# EAGLE board Pcb39 (EAGLE 8.3.2)
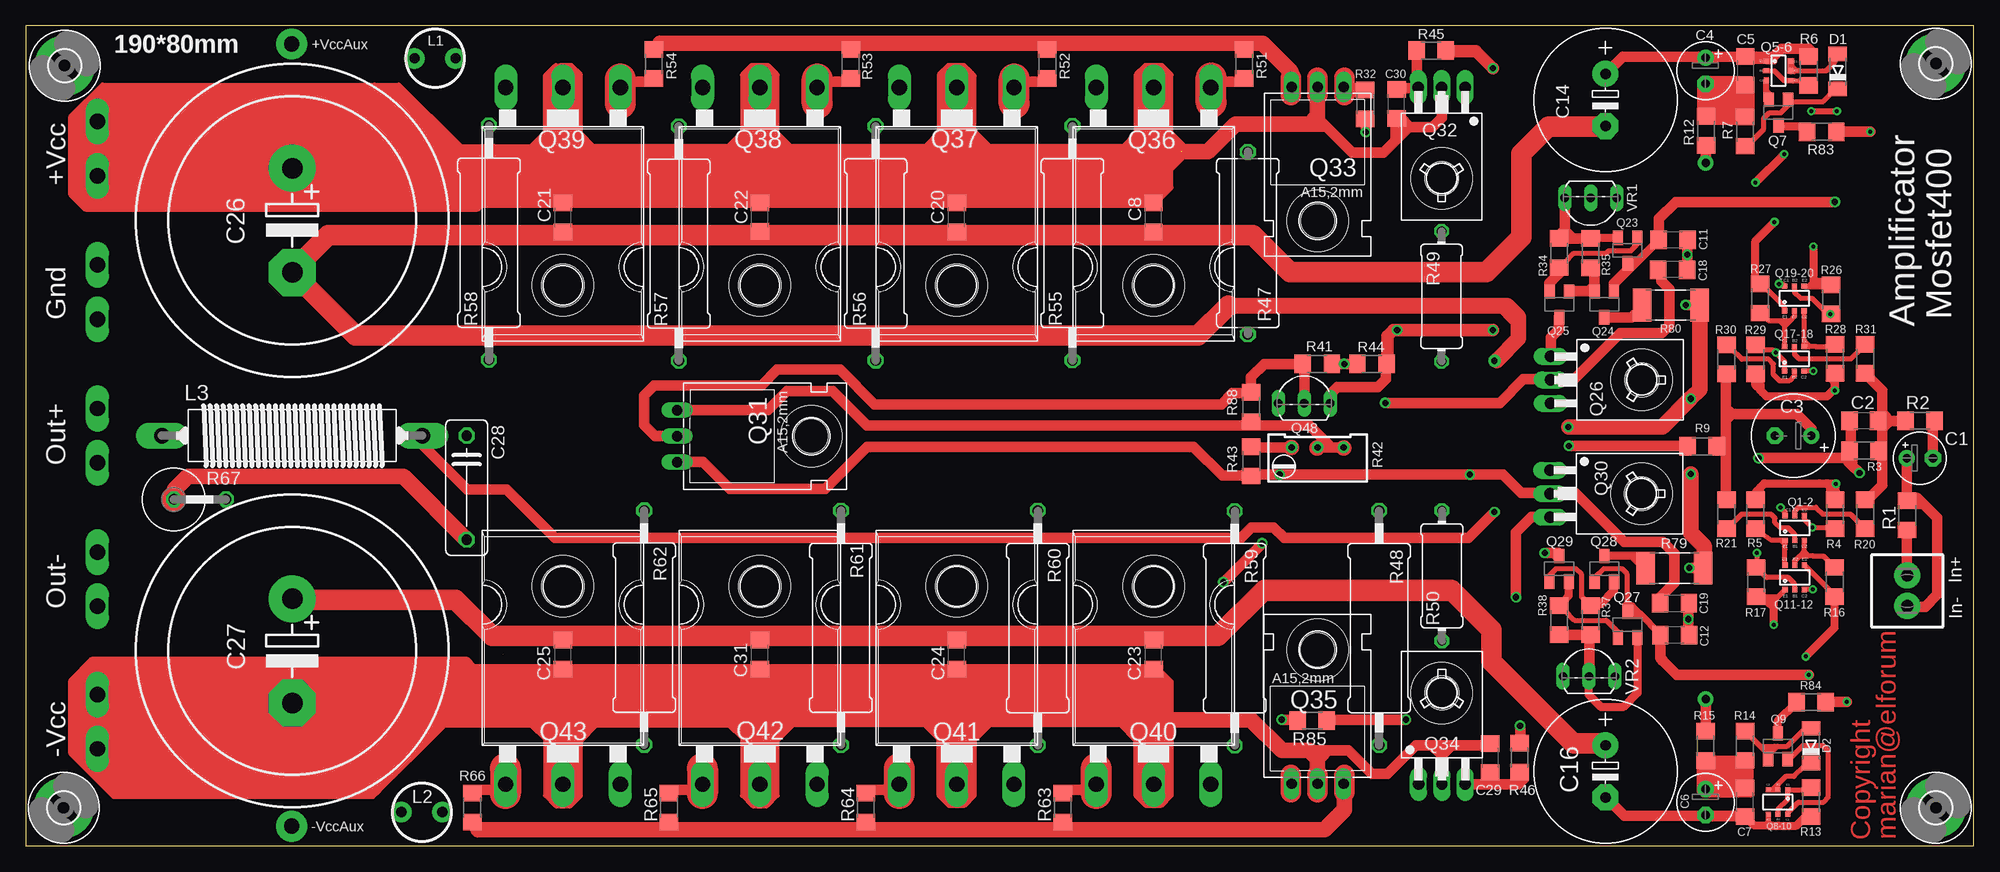
[diagram p0: board, top side]
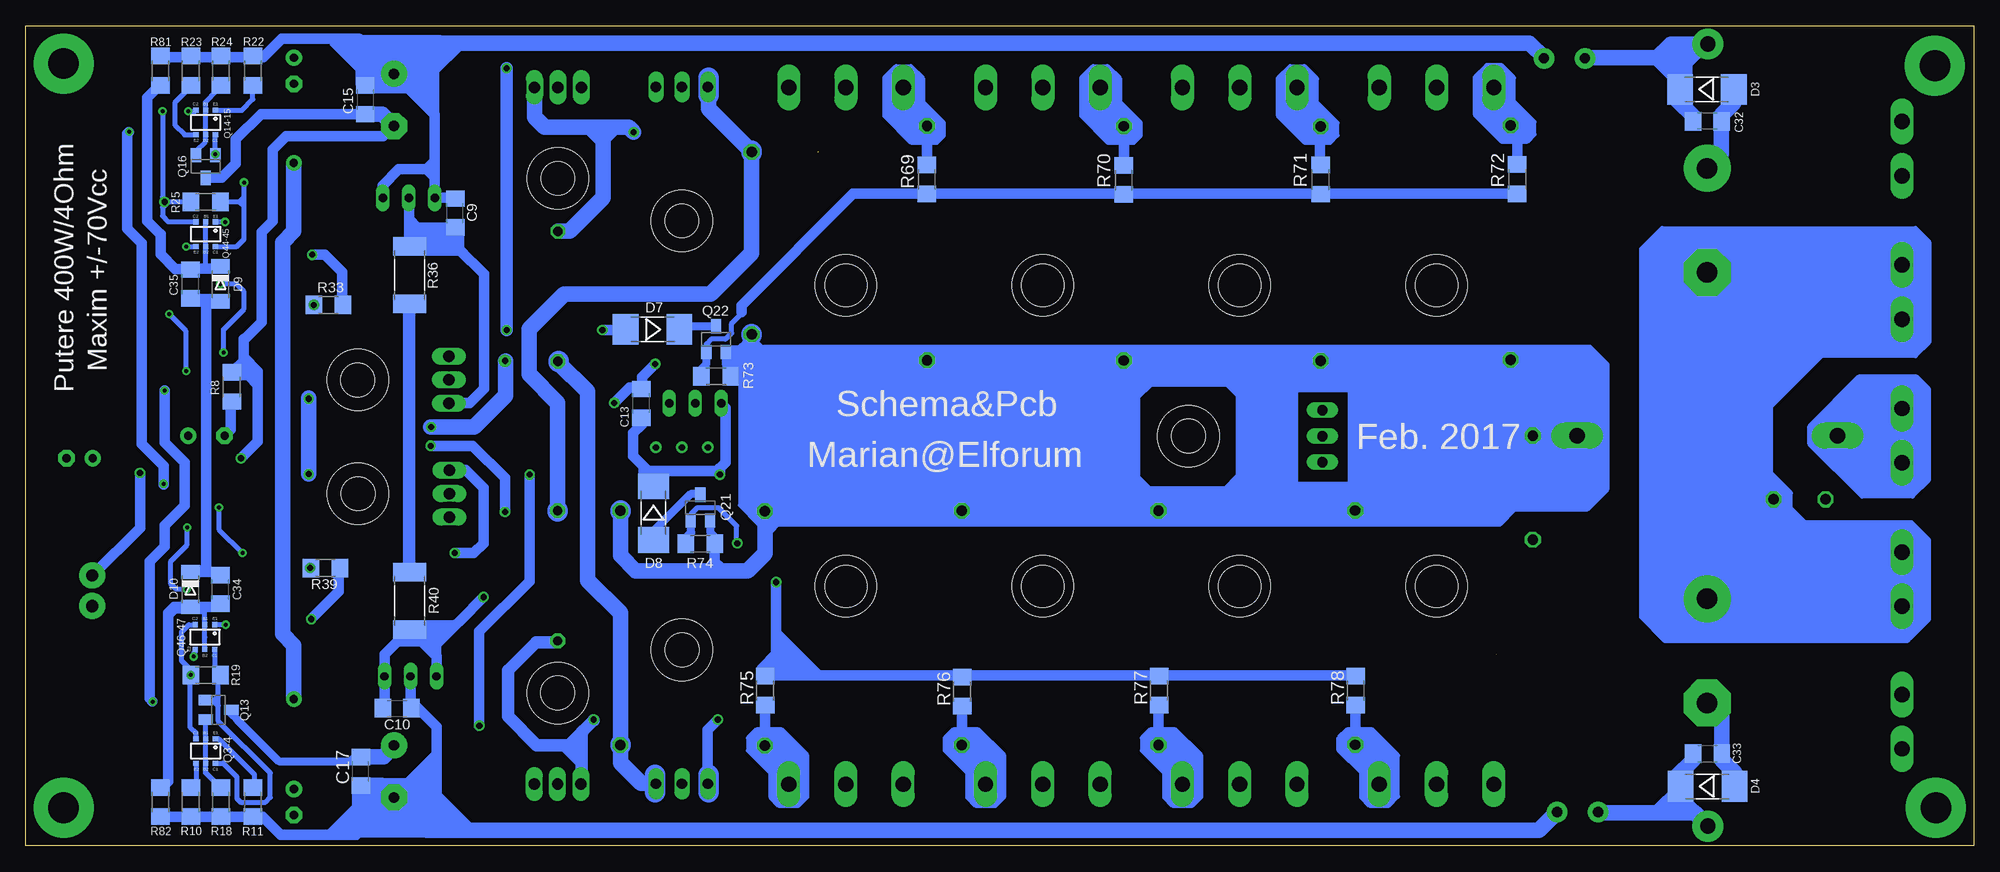
[diagram p1: board, bottom side, seen from below]

Size 190 x 80 mm. Coordinates in mm from the lower left corner, seen from the top.
Outline: 46.57,18.64 46.56,18.65
Outline: 0,0 190,0 190,80 0,80 0,0
Copper layers (1*16): Top 0.035mm / dielectric 1.5mm / Bottom 0.035mm
Design rules "default": minimum track width 10mil, minimum drill 24mil, track to track 8mil, track to pad 8mil, pad to pad 8mil, via to via 8mil, smd to smd 8mil, copper to edge 40mil, drill to drill 8mil, minimum pad ring 10mil, minimum via ring 8mil, stop-mask expansion 4mil, vias tented up to drill 0mil, thermal gap 10mil
Holes 6 mm at 157.6,45.45 157.6,34.35 138.1,14.9 126,19.1 138.1,65.1 126,60.95 110,25.3 90.8,25.3 71.6,25.3 52.4,25.3 52.4,54.65 71.6,54.65 90.8,54.65 110,54.65 76.6,39.95

## Footprints (pad centres in the part's own frame; a part is rotated, then mirrored left to right if it is on the bottom)
E2,5-5 = drill 0.813 pad 1.6: + -1.27,0 | drill 0.813 pad 1.6 octagon: - 1.27,0
C1206 = smd 1.6 x 1.8: 1 -1.4,0; 2 1.4,0
E3,5-8 = drill 0.813 pad 1.6: + -1.778,0 | drill 0.813 pad 1.6 octagon: - 1.778,0
E2,5-6 = drill 0.813 pad 1.6: + -1.27,0 | drill 0.813 pad 1.6 octagon: - 1.27,0
E5-13 = drill 1.016 pad 2.54: + -2.54,0 | drill 1.016 pad 2.54 octagon: - 2.54,0
EB30D = drill 2.007 pad 4.597: + -5.08,0 | drill 2.007 pad 4.597 octagon: - 5.08,0
C102-043X133 = drill 1.016 octagon: 1 -5.08,0; 2 5.08,0
MINIMELF = smd 1.4 x 1.8: A 1.7,0; C -1.7,0
MELF-MLL41 = smd 2.5 x 3: A 2.625,0; C -2.625,0
62409-1 = drill 1.5 pad 1.9 long: A1 -2.65,0; A2 2.65,0
CONR2P = drill 1.2 pad 2.54: 1 -1.48,0; 4 1.52,0
3,0-PAD = drill 3 pad 5.842: B3,0 0,0
VERT6MM = drill 1 pad 2: 1 -2,0; 2 2,0
DR1,5A = drill 1.5 pad 2.54 long: 1 -12.7,0; 2 12.7,0
SC74_INFINEON = smd 0.5 x 0.5: 1 -0.95,-1.2; 2 0,-1.2; 3 0.95,-1.2; 4 0.95,1.2; 5 0,1.2; 6 -0.95,1.2
SOT23 = smd 1 x 1.4: 1 -0.95,-1.25; 2 0.95,-1.25; 3 0,1.25
SOT23' = smd 1 x 1.4: 1 -0.95,-1.1; 2 0.95,-1.1; 3 0,1.1
BD679H = drill 1.118 long: B 2.286,-3.81; C 0,-3.81; E -2.286,-3.81 | hole 3.302: 0,5.08
TO220AHV = drill 1.016 long: B -2.54,-1.905; C 0,-1.905; E 2.54,-1.905 | hole 3.302: 0,11.176
TO247BH = drill 1.499 long: D 0,-10.16; G -5.588,-10.16; S 5.588,-10.16 | hole 4.115: 0,9.144
TO92-EBC = drill 0.813 long: B 0,-1.27; C -2.54,-1.27; E 2.54,-1.27
R1206 = smd 1.6 x 1.803: 1 -1.422,0; 2 1.422,0
R2512 = smd 1.8 x 3.2: 1 -2.8,0; 2 2.8,0
RTRIM64W = drill 0.61: 1 1.27,-2.54; 2 1.27,0; 3 1.27,2.54
0617/17 = drill 1.016 octagon: 1 -8.89,0; 2 8.89,0
0617/22 = drill 1.016 octagon: 1 -11.43,0; 2 11.43,0
0411/12 = drill 0.914 octagon: 1 -6.35,0; 2 6.35,0
0617V = drill 1.016 octagon: 1 -2.54,0; 2 2.54,0
TO92- = drill 0.813 long: 1 2.54,0; 2 0,0; 3 -2.54,0

## Placement (x,y rotation side)
C1  4.7u  [E2,5-5]  184.73,37.81 0 top
C2  220p  [C1206]  179.26,41.46 0 top
C3  100u  [E3,5-8]  172.37,39.99 180 top
C4  47u  [E2,5-6]  163.83,75.6 270 top
C5  100n  [C1206]  167.71,75.6 270 top
C6  47u  [E2,5-6]  163.83,4.25 270 top
C7  100n  [C1206]  167.69,4.25 90 top
C8  1u  [C1206]  109.99,61.3 90 top
C9  1u  [C1206]  148.11,61.72 90 bottom
C10  1u  [C1206]  153.76,13.41 0 bottom
C11  47p  [C1206]  160.66,59.11 0 top
C12  47p  [C1206]  160.82,20.54 180 top
C13  1u  [C1206]  129.96,43.15 90 bottom
C14  100u  [E5-13]  154.08,72.75 270 top
C15  100n  [C1206]  156.89,72.76 270 bottom
C16  100u  [E5-13]  154.08,7.25 270 top
C17  100n  [C1206]  157.31,7.26 90 bottom
C18  330p  [C1206]  160.62,56.19 180 top
C19  330p  [C1206]  160.8,23.66 0 top
C20  1u  [C1206]  90.8,61.3 90 top
C21  1u  [C1206]  52.4,61.29 90 top
C22  1u  [C1206]  71.6,61.31 90 top
C23  1u  [C1206]  110,18.64 90 top
C24  1u  [C1206]  90.8,18.64 90 top
C25  1u  [C1206]  52.4,18.64 90 top
C26  2.2m  [EB30D]  26,61 270 top
C27  2.2m  [EB30D]  26,19 270 top
C28  100n  [C102-043X133]  43.01,34.93 270 top
C29  100p  [C1206]  142.81,8.56 270 top
C30  100p  [C1206]  133.69,72.36 90 top
C31  1u  [C1206]  71.6,18.64 90 top
C32  1n  [C1206]  26,70.67 180 bottom
C33  1n  [C1206]  25.98,8.98 0 bottom
C34  1n  [C1206]  171,25 90 bottom
C35  1n  [C1206]  173.93,54.8 90 bottom
D1  4148  [MINIMELF]  176.72,75.52 90 top
D2  4148  [MINIMELF]  174.12,9.75 90 top
D3  UF4007  [MELF-MLL41]  26.03,73.78 0 bottom
D4  UF4007  [MELF-MLL41]  25.98,5.78 0 bottom
D7  UF4007  [MELF-MLL41]  128.87,50.37 180 bottom
D8  UF4007  [MELF-MLL41]  128.77,32.45 270 bottom
D9  DZ33V  [MINIMELF]  171,54.8 270 bottom
D10  DZ33V  [MINIMELF]  173.93,25 270 bottom
E$1  [62409-1]  7,12.1 90 bottom
E$2  [62409-1]  7,26 90 bottom
E$3  [62409-1]  7,68 90 top
E$4  [62409-1]  7,54 90 top
E$5  [62409-1]  7,40 90 top
E$6  [CONR2P]  183.5,24.85 90 top
E$7  [3,0-PAD]  3.8,76.1 0 top
E$8  [3,0-PAD]  3.7,3.7 0 top
E$9  [3,0-PAD]  186.3,3.7 0 top
E$10  [3,0-PAD]  186.3,76.3 0 top
L1  1mH  [VERT6MM]  39.93,76.82 0 top
L2  1mH  [VERT6MM]  38.64,3.27 0 top
L3  1u  [DR1,5A]  25.99,40 0 top
Q1-2  BC856U-1  [SC74_INFINEON]  172.53,30.99 0 top
Q3-4  BC846U-2  [SC74_INFINEON]  172.44,9.24 180 bottom
Q5-6  BC856U-1  [SC74_INFINEON]  170.94,75.59 270 top
Q7  MMBT5401  [SOT23]  170.94,71.52 180 top
Q8-10  BC846U-1  [SC74_INFINEON]  170.89,4.25 180 top
Q9  MMBT5551  [SOT23]  170.89,9.71 0 top
Q11-12  BC846U  [SC74_INFINEON]  172.53,26.17 0 top
Q13  MMBT5551  [SOT23]  171.19,13.26 270 bottom
Q14-15  BC856U-2  [SC74_INFINEON]  172.44,70.56 180 bottom
Q16  MMBT5401  [SOT23']  172.44,66.26 180 bottom
Q17-18  BC846U-1  [SC74_INFINEON]  172.49,47.49 0 top
Q19-20  BC856U  [SC74_INFINEON]  172.49,53.38 0 top
Q21  MMBT5401  [SOT23]  124.2,32.98 0 bottom
Q22  MMBT5551  [SOT23]  122.67,49.41 0 bottom
Q23  MMBT5401  [SOT23]  156.22,58.06 180 top
Q24  MMBT5401  [SOT23]  153.95,52.81 180 top
Q25  MMBT5401  [SOT23]  149.58,52.81 180 top
Q26  MJE350  [BD679H]  152.53,45.44 270 top
Q27  MMBT5551  [SOT23]  156.22,21.56 0 top
Q28  MMBT5551  [SOT23]  153.96,27.01 0 top
Q29  MMBT5551  [SOT23]  149.55,27.01 0 top
Q30  MJE340  [BD679H]  152.49,34.34 270 top
Q31  IRF540  [TO220AHV]  65.44,39.95 270 top
Q32  MJE340  [BD679H]  138.1,70.18 180 top
Q33  MJE15032  [TO220AHV]  126,72.13 180 top
Q34  MJE350  [BD679H]  138.12,9.83 0 top
Q35  MJE15033  [TO220AHV]  125.99,7.94 0 top
Q36  IRFP240  [TO247BH]  110,63.81 180 top
Q37  IRFP240  [TO247BH]  90.8,63.81 180 top
Q38  IRFP240  [TO247BH]  71.6,63.81 180 top
Q39  IRFP240  [TO247BH]  52.4,63.81 180 top
Q40  IRFP9240  [TO247BH]  110,16.15 0 top
Q41  IRFP9240  [TO247BH]  90.8,16.15 0 top
Q42  IRFP9240  [TO247BH]  71.6,16.15 0 top
Q43  IRFP9240  [TO247BH]  52.4,16.15 0 top
Q44-45  BC846U-1  [SC74_INFINEON]  172.44,59.66 180 bottom
Q46-47  BC856U-2  [SC74_INFINEON]  172.52,20.36 180 bottom
Q48  BC556C  [TO92-EBC]  124.7,44.43 0 top
R1  100k  [R1206]  183.5,32.22 90 top
R2  470  [R1206]  184.76,41.45 0 top
R3  18k  [R1206]  179.3,38.55 180 top
R4  100  [R1206]  176.46,32.34 90 top
R5  100  [R1206]  168.69,32.34 90 top
R6  330  [R1206]  173.9,75.58 270 top
R7  15k  [R1206]  167.7,69.66 90 top
R8  470  [R1206]  169.9,44.75 90 bottom
R9  18k  [R1206]  163.49,38.95 0 top
R10  150  [R1206]  173.9,4.25 270 bottom
R11  150  [R1206]  167.82,4.25 270 bottom
R12  15k  [R1206]  163.87,69.72 90 top
R13  330  [R1206]  174.12,4.25 270 top
R14  15k  [R1206]  167.67,9.75 90 top
R15  15k  [R1206]  163.82,9.74 90 top
R16  5k6  [R1206]  176.43,25.72 270 top
R17  5k6  [R1206]  168.77,25.72 90 top
R18  1k  [R1206]  170.94,4.25 270 bottom
R19  100k  [R1206]  172.44,16.63 0 bottom
R20  330  [R1206]  179.41,32.34 90 top
R21  330  [R1206]  165.86,32.34 90 top
R22  150  [R1206]  167.82,75.6 270 bottom
R23  33k  [R1206]  173.9,75.6 270 bottom
R24  1k  [R1206]  170.94,75.6 270 bottom
R25  100k  [R1206]  172.44,62.79 180 bottom
R26  5k6  [R1206]  176.09,53.29 90 top
R27  5k6  [R1206]  169.14,53.38 90 top
R28  100  [R1206]  176.46,47.49 270 top
R29  100  [R1206]  168.69,47.46 90 top
R30  330  [R1206]  165.86,47.45 90 top
R31  330  [R1206]  179.41,47.49 270 top
R32  4,7  [R1206]  130.66,72.32 270 top
R33  1k  [R1206]  160.47,52.74 180 bottom
R34  15  [R1206]  149.56,57.82 90 top
R35  1k  [R1206]  152.61,57.81 90 top
R36  33k/2512  [R2512]  152.56,55.66 90 bottom
R37  1k  [R1206]  152.61,22 90 top
R38  15  [R1206]  149.56,21.99 90 top
R39  1k  [R1206]  160.77,27.09 0 bottom
R40  33k/2512  [R2512]  152.54,23.89 270 bottom
R41  1k  [R1206]  125.97,46.99 0 top
R42  5k  [RTRIM64W]  126,37.58 90 top
R43  3k3  [R1206]  119.54,37.49 270 top
R44  22  [R1206]  131.3,46.99 0 top
R45  4,7  [R1206]  137.06,77.56 180 top
R46  4,7  [R1206]  145.71,8.59 270 top
R47  47/3W  [0617/17]  119.2,58.79 90 top
R48  47/3W  [0617/22]  132,21.23 270 top
R49  220/1W  [0411/12]  138.08,53.59 90 top
R50  220/1W  [0411/12]  138.12,26.33 270 top
R51  10  [R1206]  118.85,76.27 90 top
R52  10  [R1206]  99.65,76.27 90 top
R53  10  [R1206]  80.45,76.27 90 top
R54  10  [R1206]  61.25,76.27 90 top
R55  0.33/3W  [0617/22]  102.09,58.78 270 top
R56  0.33/3W  [0617/22]  82.89,58.76 270 top
R57  0.33/3W  [0617/22]  63.69,58.74 270 top
R58  0.33/3W  [0617/22]  45.19,58.82 270 top
R59  0.33/3W  [0617/22]  117.92,21.21 90 top
R60  0.33/3W  [0617/22]  98.72,21.23 90 top
R61  0.33/3W  [0617/22]  79.52,21.25 90 top
R62  0.33/3W  [0617/22]  60.32,21.27 90 top
R63  10  [R1206]  101.14,3.73 90 top
R64  10  [R1206]  81.95,3.73 90 top
R65  10  [R1206]  62.75,3.73 90 top
R66  10  [R1206]  43.55,3.73 90 top
R67  10/3W  [0617V]  16.99,33.78 0 top
R69  470  [R1206]  102.12,65 90 bottom
R70  470  [R1206]  82.92,64.94 90 bottom
R71  470  [R1206]  63.72,64.98 90 bottom
R72  470  [R1206]  44.52,65.02 90 bottom
R73  100  [R1206]  122.67,45.8 180 bottom
R74  100  [R1206]  124.19,29.45 0 bottom
R75  470  [R1206]  117.88,15.12 90 bottom
R76  470  [R1206]  98.68,15.03 90 bottom
R77  470  [R1206]  79.47,15.13 90 bottom
R78  470  [R1206]  60.28,15.12 90 bottom
R79  2k2/2512  [R2512]  160.78,27.07 0 top
R80  2k2/2512  [R2512]  160.45,52.73 180 top
R81  150  [R1206]  176.84,75.6 270 bottom
R82  33k  [R1206]  176.84,4.25 270 bottom
R83  15k  [R1206]  175.16,69.65 180 top
R84  15k  [R1206]  174.13,14 0 top
R85  4,7  [R1206]  125.48,12.2 180 top
R88  8k2  [R1206]  119.53,42.8 270 top
VR1  TL431  [TO92-]  152.63,63.18 180 top
VR2  TL431  [TO92-]  152.47,16.52 0 top

## Library data of the parts
C1-C35 R1-R46 R51-R54 R63-R66 R69-R85 R88 = resistor
D1-D4 D7-D10 = diode
E$1-E$5 = con-faston
E$6 = ConR2p3m-2
E$7-E$10 = holes
L1 L2 = inductor-neosid2
L3 = inductors2
Q1-2 Q3-4 Q5-6 Q8-10 Q11-12 Q14-15 Q17-18 Q19-20 Q44-45 Q46-47 = transistor-fet
Q7 Q9 Q13 Q21-Q25 Q27-Q29 = transistor-npn2
Q16 VR1 VR2 = transistor-npn
Q26 Q30 Q32 Q34 = transistor-power3
Q31 Q33 Q35-Q43 = transistor-power
Q48 = transistor-pnp
R47-R50 R55-R62 R67 = resistor; OC_FARNELL: unknown; OC_NEWARK: unknown

## Nets
S$38: Q9.1
S$53: Q9.3 R84.1
S$56: C7.1 Q8-10.4 R13.2
S$103: R48.2
S$104: Q8-10.2 Q8-10.3
S$129: R47.1
S$148: R42.2
S$160: Q8-10.1 R13.1
S$179: C17.2
S$201: C6.-
S$232: Q3-4.1 R11.1
S$233: Q3-4.4 R10.1
S$234: Q3-4.2 Q3-4.5 Q13.2 R18.1
S$235: Q3-4.3 Q46-47.3 R19.1
S$236: Q3-4.6 Q13.1
S$274: Q46-47.6 R19.2
S$276: Q11-12.1 R17.1
S$281: Q1-2.6 Q11-12.2 R17.2
S$282: Q11-12.4 R16.2
S$283: Q1-2.3 Q11-12.5 R16.1
S$284: D10.C
S$286: Q46-47.2 Q46-47.5
S$290: Q1-2.1 Q11-12.6 R5.1
S$291: Q1-2.4 R4.1
S$292: Q1-2.2
S$293: R9.2
S$294: Q1-2.5
S$297: R28.2 R84.2
S$307: R4.2 R83.1

## Tracks (layer width: path | path; a pad name or v marks a point on that pad's centre or on a via)
S$1
  Top 1: 154.05,75.25 155.75,76.95 170.45,76.95 171.25,77.75 173.9,77.75 174.25,77.4
S$2
  Top 1: 167.6,74.3 163.8,74.3 163.8,71.1
S$3
  Top 1: 163.85,71.05 167.65,71.05
S$4
  Top 0.6: 169.75,74.65 169.75,74.05 169.75,73.6 | 169.75,73.6 170.2,73.15 170.2,72.7 | 169.75,73.6 169.75,72.65 169.9,72.5
S$5
  Top 0.5: 173.35,74.65 171.5,74.65 170.55,75.6 169.65,75.6
S$6
  Top 0.6: 172.15,75.55 172.15,76.55
S$7
  Top 0.5: 172.05,75.6 175.6,75.6 175.85,75.85 176.1,76.1 | 176.1,76.1 176.45,76.45 176.45,76.8 | 176.1,76.1 176.1,76.95
S$8
  Top 0.5: 171.9,72.6 175.3,72.6 176.5,73.8
S$9
  Top 0.5: 171.9,72.55 171.9,72.25 171.15,71.5 170.05,71.5 169.5,70.95 169.5,70.55 169.5,70.4 169.5,69.9 168.4,68.8
S$10
  Top 0.8: 173.65,70.15 170.9,70.15
S$11
  Top 1: 154.05,4.75 155.9,2.9 163.8,2.9 163.85,2.9 167.55,2.9
S$12
  Top 1: 163.8,5.6 167.7,5.6
S$13
  Top 1: 163.65,8.3 167.75,8.3
S$14
  Top 1: 163.8,5.55 163.8,8.1
S$15
  Top 1: 63.26,5.45 64.89,5.45
S$16
  Top 1.5: 123.4,74 123.4,74.9 123.4,75.5 120.6,78.3 61.88,78.3
  Top 2: 123.4,74.9 123.4,73.2
S$17
  Bottom 0.5: 73,34.8 80.4,34.8 81.5,35.9 81.5,43.8 80.3,45 72.8,45 71.7,43.9 71.7,36.1 73,34.8
S$18
  Bottom 0.5: 36.2,43.7 43.5,48.6 | 43.5,48.6 49.15,48.6 118.2,48.6 120.3,46.5 120.3,33.2 118.5,31.4 46.2,31.4 44.75,32.85 37.7,32.85 35.75,34.8 35.75,46.9 37.45,48.6 43.5,48.6
S$19
  Top 1.5: 41.6,66.8 41.6,67.8 36,73.4 34.7,73.4 | 34.7,73.4 34.4,73.4 | 34.7,73.4 40.5,67.6
S$20
  Bottom 0.5: 56.2,4.8 56.2,8.8 58.7,11.3 61.1,11.3 61.9,10.5 61.9,9.3 59.7,7.1 59.7,4.7 58.9,3.9 57.1,3.9 56.2,4.8
S$21
  Top 0.5: 47.2,11.8 40.85,11.8 33.85,4.8 32.8,4.8 | 47.2,11.8 49.3,11.8 50.7,10.4 50.7,4.9 51.7,3.9 53.1,3.9 54.1,4.9 54.1,10.2 55.7,11.8 68.6,11.8 69.9,10.5 69.9,4.9 70.9,3.9 72.3,3.9 73.3,4.9 73.3,10.3 74.8,11.8 87.7,11.8 89.1,10.4 89.1,4.9 90.1,3.9 91.5,3.9 92.5,4.9 92.5,10.3 94,11.8 106.8,11.8 108.3,10.3 108.3,4.9 109.3,3.9 110.7,3.9 111.7,4.9 111.7,16 110.2,17.5 43.7,17.5 43,18.2 6.5,18.2 4.4,16.1 4.4,9 8.6,4.8 32.8,4.8 | 47.2,11.8 47.2,12.3 | 32.8,4.8 32.8,5.9
S$22
  Bottom 1: 152.6,61.1 152.6,63.2 | 152.6,61.1 152.6,58.3 | 148.2,60.3 150.2,60.3 150.7,60.3 | 150.7,60.3 151.8,60.3 152.6,61.1 | 150.7,60.3 151.9,59.1
S$23
  Bottom 1: 152,60 152,59.6 151.9,59.5
S$24
  Bottom 1.5: 118.1,47.5 119.6,46 119.6,33.5 118.3,32.2
S$25
  Bottom 0.5: 75.4,4.8 75.4,8.8 77.9,11.3 80.3,11.3 81.1,10.5 81.1,9.3 78.9,7.1 78.9,4.7 78.1,3.9 76.3,3.9 75.4,4.8
S$26
  Top 1.5: 154.05,70.25 148.5,70.25 145.95,67.7 145.95,59.45 145.85,59.35
  Top 2: 153.95,70.15 148.5,70.15 145.85,67.5 145.85,59.35 142.45,55.95 123.3,55.95 119.7,59.55 29.5,59.55 25.9,55.95
S$27
  Top 1.2: 143.9,52.65 145.3,51.25
  Top 1.5: 143.5,47.35 145.6,49.45 145.6,51.55 144.45,52.7 117.3,52.7 | 143.9,52.65 117.3,52.65 114.4,49.75 40.6,49.75 | 26,55.8 26.1,55.8 32.15,49.75 38,49.75
  Top 2: 117.3,52.7 114.35,49.75 40.6,49.75 38,49.75 32.2,49.75 26,55.95
S$28
  Bottom 1.5: 143.2,47.3 143.2,43.9 146.25,40.85 150.5,40.85
S$29  (via drill 0.6, 0.6 pad 1.2)
  Top 1: 162.4,43.65 v162.4,43.6 159.6,40.85 | v150.45,40.85 150.5,40.85
  Top 1.5: 163.7,27.15 163.7,29.2 162.4,30.5 | 162.4,30.5 162.35,30.55 | v162.4,36.25 162.4,30.5 | 163.25,51.95 163.25,44.5 162.4,43.65 159.6,40.85 150.5,40.85
  Bottom 1: v162.4,43.6 v162.4,36.25 | v150.45,40.85 146.2,40.7 143.25,43.65 v143.25,47.3
  Bottom 1.5: v162.4,36.25 162.4,43.65
S$30
  Top 1.5: 38.3,59.6 117.4,59.6
S$31
  Top 1.2: 143.1,75.85 141.45,77.5 138.5,77.5
S$32  (via drill 0.6)
  Top 1: v130.7,69.6 130.7,70.4
  Bottom 1: 138.05,59.9 137.1,59.9 133.7,63.3 133.7,66.7 | 140.3,73.4 140.3,71.2 139.2,70.1 134.95,70.1 134.85,70.1 | 132.75,70.1 132.65,70.1 | 133.7,70.1 132.75,70.1 | 133.7,70.1 134.85,70.1 | 133.7,69.15 133.7,70.1 | 133.7,67.45 133.7,69.15 | 133.7,69.15 132.75,70.1 | 133.7,67.8 133.7,68.95 134.85,70.1
  Bottom 1.5: v130.7,69.6 131.2,70.1 132.65,70.1 | 134.95,70.1 132.65,70.1 | 134.95,70.1 139.4,70.1 140.35,71.05 140.35,74.45 | 133.7,68.85 133.7,69.05 132.65,70.1 | 133.7,68.85 133.7,67.45 133.7,66.7 133.7,63.2 136.95,59.95 138.05,59.95 | 133.7,68.85 134.95,70.1
S$33
  Top 0.5: 169.75,76.55 170.6,76.55
  Top 0.6: 169.85,76.55 169.75,76.55 167.85,76.55
S$34  (via drill 0.6)
  Top 1: 127.3,12.3 v134.6,12.3
S$35
  Bottom 1.2: 136,9.75 137.25,9.75
S$36
  Bottom 1: 116.25,19.4 116.25,19.1 114.15,17
S$37
  Bottom 1: 116.15,18.55 116.15,18.25 117.25,17.15 115.15,17.15 | 115.15,17.15 114.85,17.15 | 115.15,17.15 115.9,17.9
S$38
  Top 0.5: 173.25,11.15 173.15,11.05 171.8,9.7 170.55,9.7 169.95,9.1 Q9.1 | 173.25,11.15 174,11.15 | 173.25,11.15 173.45,11.35
S$39
  Bottom 0.5: 94.6,4.8 94.6,8.8 97.1,11.3 99.5,11.3 100.3,10.5 100.3,9.3 98.1,7.1 98.1,4.7 97.3,3.9 95.5,3.9 94.6,4.8
S$40
  Bottom 0.5: 113.8,4.8 113.8,8.8 116.3,11.3 117.9,11.3 118.7,11.3 119.5,10.5 119.5,9.3 117.3,7.1 117.3,4.7 116.5,3.9 114.7,3.9 113.8,4.8
  Bottom 1: 117.9,11.3 117.9,13.7
S$41
  Bottom 0.5: 46.1,76.1 47.5,76.1 48.6,75 48.6,71.3 46,68.7 43.6,68.7 42.9,69.4 42.9,70.6 44.9,72.6 44.9,74.9 46.1,76.1
S$42
  Bottom 0.5: 66.7,76 65.3,76 64.1,74.8 64.1,72.5 62.1,70.5 62.1,69.3 62.8,68.6 65.2,68.6 67.8,71.2 67.8,74.9 66.7,76
S$43
  Bottom 0.5: 85.9,76 84.5,76 83.3,74.8 83.3,72.5 81.3,70.5 81.3,69.3 82,68.6 84.4,68.6 87,71.2 87,74.9 85.9,76
S$44
  Bottom 0.5: 105.1,76 103.7,76 102.5,74.8 102.5,72.5 100.5,70.5 100.5,69.3 101.2,68.6 103.6,68.6 106.2,71.2 106.2,74.9 105.1,76
S$45
  Top 1.5: 44.11,1.57 123.26,1.57 123.76,1.57 126.67,1.57 126.7,1.6 126.77,1.67 128.6,3.5 128.6,6
S$46
  Top 1: 116.68,74.55 118.31,74.55
S$47
  Top 1: 59.07,74.55 60.7,74.55
S$48
  Top 1: 78.28,74.55 79.91,74.55
S$49
  Top 1: 97.48,74.55 99.11,74.55
S$50
  Top 1: 103.3,5.45 101.67,5.45
S$51
  Top 1: 82.46,5.45 84.09,5.45
S$52
  Top 1: 44.05,5.45 45.68,5.45
S$53
  Top 0.5: Q9.3 170.89,11.28
  Top 0.8: Q9.3 170.89,12.18 R84.1
S$54
  Top 2.5: 14.46,33.78 14.46,33.8
S$55
  Bottom 0.5: 30.1,20 32.4,22.3 32.4,58.2 30.4,60.2 5.7,60.2 4.4,58.9 4.4,49.1 5.7,47.8 14.9,47.8 19.8,42.9 19.8,36.3 17.9,34.4 17.9,32.9 16.5,31.5 6.1,31.5 4.4,29.8 4.4,22.1 5.7,20.8 6.2,20.3 6.5,20 26,20 27.1,20 30.1,20
S$56
  Top 0.5: 173.58,2.83 R13.2 | Q8-10.4 169.94,1.96 169.95,1.95 169.55,1.95 169.95,2.35 | 169.95,2.95 169.95,2.35 | 169.95,2.35 170.35,1.95
  Top 0.8: 173.58,2.83 172.7,1.95 170.96,1.95 170.35,1.95 | 169.95,1.95 170.35,1.95 | C7.1 168.59,1.95 169.24,1.95 169.55,1.95 170.35,1.95
S$57
  Top 1.5: 14.5,33.8 14.5,34.7 15.8,36 36.85,36 43,29.85
S$58
  Top 1.5: 44.05,12.3 40.45,12.3 33.5,5.35 15.8,5.35
S$59
  Bottom 0.5: 4.4,35.7 6,34.1 10.9,34.1 16,39.2 16,40.9 11.2,45.7 5.6,45.7 4.4,44.5 4.4,35.7
S$60
  Bottom 1.2: 152.6,26.9 152.6,53
S$61
  Top 1: 124.55,47 120.8,47 119.5,45.7 119.5,44.25
S$62
  Top 1: 119.35,38.85 123.4,38.85
  Top 1.5: 123.4,38.85 123.45,38.85
S$63
  Top 1: 124.7,43.2 124.7,47.1
S$64
  Bottom 1: 44.5,66.7 44.5,68.8
S$65
  Bottom 1: 63.8,66.5 63.8,68.8
S$66
  Bottom 1: 82.9,66.4 82.9,68.8
S$67
  Bottom 1: 102.1,66.3 102.1,68.8
S$68
  Bottom 1: 44.4,63.6 109.3,63.6 120.2,52.7 120.2,52.05
S$69
  Bottom 1: 98.7,11.4 98.7,13.2
S$70
  Bottom 1: 79.5,11.4 79.5,13.6
S$71
  Bottom 1: 60.3,11.4 60.3,13.5
S$72
  Bottom 1: 116.8,20.75 116.8,25.75 | 112.65,16.6 116.8,20.75 | 60,16.6 112.65,16.6 | 112.65,16.6 118,16.6 | 116.8,20.75 116.8,18.7 118.2,17.3 118.2,16.45
S$73
  Top 0.5: 52.2,76.1 53.2,76.1 54.1,75.2 54.1,69.5 55.4,68.2 68.5,68.2 69.9,69.6 69.9,75.2 70.8,76.1 72.4,76.1 73.3,75.2 73.3,69.5 74.6,68.2 87.7,68.2 89.1,69.6 89.1,75.2 90,76.1 91.5,76.1 92.5,75.1 92.5,69.7 94,68.2 107,68.2 108.3,69.5 108.3,75.2 109.2,76.1 110.8,76.1 111.7,75.2 111.7,64.2 110,62.5 44.5,62.5 44.1,62.1 5.8,62.1 4.4,63.5 4.4,71.1 7.5,74.2 33.5,74.2 34,74.2 | 52.4,76.1 51.7,76.1 50.7,75.1 50.7,69.6 49.3,68.2 45.7,68.2 | 34,74.2 42.4,68.2 | 45.7,68.2 45.7,67.5 | 42.4,68.2 45.7,68.2 | 42.4,68.2 36.4,74.2 34,74.2
  Top 1.5: 33,72.8 33,72.9 33.4,73.3 7.8,73.3 5.3,70.8 5.3,63.7 6,63 43.7,63 44,63.3 109.7,63.3 111,64.6 111,74.9 110.5,75.4 109.8,75.4 109.1,74.7 109.1,69 107.4,67.3 93.7,67.3 91.6,69.4 91.6,74.8 91,75.4 90.4,75.4 89.9,74.9 89.9,69.1 88,67.2 87.9,67.3 74.3,67.3 72.5,69.1 72.5,74.7 71.8,75.4 71.2,75.4 70.6,74.8 70.6,69.1 68.8,67.3 55,67.3 53.3,69 53.3,74.8 52.8,75.3 52.1,75.3 51.5,74.7 51.5,69.2 49.8,67.5 45.7,67.5 39.5,67.5 33.6,73.4 33.6,73.2
S$74
  Bottom 1.5: 93.3,34.8 93.3,44.7
S$75
  Top 3: 34.9,67 36,67 36.4,66.6 7.1,66.6 7,66.7 | 33.1,71.4 8.8,71.4 7,69.6 7,69.1 | 7,66.7 7,64.7 7.1,64.6 108.3,64.6 109.1,65.4 109.3,65.4 110,66.1 110,67.2 | 110,67.2 110,74.5 | 110,67.2 108.7,65.9 93.1,65.9 90.7,68.3 90.7,74.6 90.8,74.7 90.8,67.3 89.9,66.4 72.7,66.4 71.5,67.6 71.5,67.7 | 71.5,67.7 71.5,74.6 | 71.5,67.7 70.3,66.5 53.8,66.5 52.4,67.9 52.4,74.4 52.5,74.5 52.5,67.7 51.1,66.3 38.4,66.3 33.8,70.9 | 7,66.7 7,69.1 | 7,69.1 7.5,69.6 7.5,69.3 8,68.8 34.4,68.8 34.7,68.5
S$76
  Top 1.5: 43.4,12.6 49.6,12.6 51.6,10.6 51.6,5.2 52.1,4.7 52.7,4.7 53.3,5.3 53.3,10.7 55.3,12.7 68.8,12.7 70.7,10.8 70.7,5.1 71.2,4.6 71.9,4.6 72.5,5.2 72.5,10.8 74.3,12.6 88.2,12.6 90,10.8 90,5.1 90.5,4.6 91.2,4.6 91.8,5.2 91.8,10.8 93.6,12.6 107.1,12.6 109.1,10.6 109.1,5.3 109.9,4.5 110.3,4.5 111,5.2 111,15.6 109.8,16.8 43.3,16.8 42.8,17.3 6.8,17.3 5.3,15.8 5.3,9.3 8.9,5.7 11.7,5.7
S$77
  Top 3: 13.4,7.4 9.7,7.4 7.2,9.9 7.2,14.6 8.1,15.5 7,15.5 6.7,15.2 108.7,15.2 109.5,14.4 109.5,13.5 110,13 110,12.1 | 110,12.1 110,5.9 | 110,12.1 108.3,13.8 92.8,13.8 90.9,11.9 90.9,5.4 90.8,5.3 90.8,12.2 89.8,13.2 72.2,13.2 71.6,12.6 71.6,5.5 71.5,5.4 71.5,12.3 70.5,13.3 52.7,13.3 52.3,12.9 52.3,5.4 52.4,5.3 52.4,12.3 51.1,13.6 39.1,13.6 33.2,7.7 12.2,7.7 9.7,10.2 9.7,12.4 9.5,12.6 36,12.6 36.6,13.2 36.6,12.2 34.8,10.4 11.2,10.4 9.9,11.7
S$78
  Bottom 1.5: 104.6,75.2 104,75.2 103.3,74.5 103.3,72.2 101.3,70.2 101.3,69.7 101.7,69.3 103.2,69.3 105.3,71.4 105.3,74.8 104.9,75.2 104.7,75.2 104.4,74.9 104.4,72.3 102.1,70
S$79
  Bottom 1.5: 85.4,75.1 84.8,75.1 84.1,74.4 84.1,72.2 82.1,70.2 82.1,69.5 82.4,69.2 83.9,69.2 86.2,71.5 86.2,74.6 85.6,75.2 85.6,74.8 85.2,74.4 85.2,72.1 83.2,70.1
S$80
  Bottom 1.5: 66.2,75.3 65.9,75.3 64.9,74.3 64.9,72.2 62.9,70.2 62.9,69.7 63.2,69.4 64.8,69.4 67,71.6 67,74.6 66.2,75.4 66.2,72.4 63.7,69.9
S$81
  Bottom 1.5: 46.8,75.3 46.8,75.1 | 46.8,75.3 46.5,75.3 45.7,74.5 45.7,72.3 43.7,70.3 43.7,69.7 44.1,69.3 45.5,69.3 47.8,71.6 47.8,74.6 47.1,75.3 46.8,75.3 | 46.8,75.3 46.7,75.2 46.7,72 44.8,70.1
S$82
  Bottom 1.5: 118,10.5 116.7,10.5 114.6,8.4 114.6,5.1 115.1,4.6 116.1,4.6 116.5,5 116.5,7.3 118.7,9.5 118.7,10.2 118.3,10.6 118.2,10.6 115.7,8.1 115.7,5.3 115.6,5.2
S$83
  Bottom 1.5: 98.9,10.6 97.6,10.6 95.3,8.3 95.3,5.3 96,4.6 96.9,4.6 97.3,5 97.3,7.4 99.5,9.6 99.5,10.2 99.3,10.4 99,10.4 96.4,7.8 96.4,5.6 96.5,5.5
S$84
  Bottom 1.5: 79.5,10.4 78.3,10.4 76.2,8.3 76.2,5.3 76.8,4.7 77.6,4.7 78.1,5.2 78.1,7.4 80.4,9.7 80.4,10.1 79.9,10.6 77.2,7.9 77.2,5.3
S$85
  Bottom 1.5: 60.3,10.6 59.2,10.6 57,8.4 57,5.1 57.6,4.5 58.5,4.5 58.9,4.9 58.9,7.4 61.1,9.6 61.1,10.1 60.5,10.7 60.5,10.5 58,8 58,5 57.8,4.8
S$86
  Bottom 1.5: 117.8,47.7 43.8,47.7 37,43.3
S$87
  Bottom 1.5: 82.2,38.6 82.2,44.2 80.7,45.7 72.5,45.7 70.9,44.1 70.9,35.7 72.6,34 80.7,34 82.2,35.5 82.2,38.3
S$88
  Bottom 3: 109.7,45.8 82.5,45.8 81.7,46.6 71,46.6 70.1,45.7 44.1,45.7 38.7,42.7
S$89
  Bottom 1.5: 86,35.1 86,44.6
S$90
  Bottom 3: 96.3,43.4 95.3,43.4 95.1,43.6 95.1,36.2 115.4,36.2 115.4,43.7 97.7,43.7 97.5,43.5 97.5,38.6 97.6,38.5 113.1,38.5 113.2,38.4 113.2,41 113.5,41.3 98.6,41.3 97.9,40.6
S$91
  Bottom 3: 83.9,35.8 83.9,44.2 84,44.3
S$92
  Bottom 3: 43.3,41.4 45.3,43.4
S$93
  Bottom 1.5: 15.2,39.6 15.2,40.6 10.9,44.9 6,44.9 5.1,44 5.1,36.1 6.3,34.9 10.4,34.9 14.7,39.2
S$94
  Bottom 1.5: 14.1,39.7 14.1,39.9 10.4,43.6 6.6,43.6 6.5,43.5 6.5,36.4 6.9,36 9.6,36 13,39.4 12.9,39.4 10,42.3 7.3,42.3 7.3,36.8 8.9,36.8 11.5,39.4 11.4,39.4 9.7,41.1 7.9,41.1 7.9,38 8.1,37.8 8.4,37.8 10,39.4 9.7,39.4 8.9,40.2 8.9,39.4 8.7,39.2
S$95
  Bottom 4.5: 45.2,44.2 43.8,44.2 41,41.4
S$96
  Bottom 1.5: 119,33.4 119,32.65 118.9,32.55 116.8,32.55 116.8,32.2 116.7,32.1 46.65,32.1 45,33.75 38,33.75 36.55,35.2 36.55,46.5 37.9,47.85 48.65,47.85
S$97
  Bottom 1.5: 26.6,59.3 25.3,59.3 5.9,59.3 5.1,58.5 5.1,49.6 6.2,48.5 15.4,48.5 20.5,43.4 20.5,35.8 18.7,34 18.7,32.4 17,30.7 6.5,30.7 5.2,29.4 5.2,22.5 6.9,20.8 29.8,20.8 31.5,22.5 31.5,57.8 30,59.3 26.6,59.3
S$98
  Bottom 3: 7.8,57.2 6.8,57.2 6.7,57.3 6.7,50.7 7.3,50.1 16.2,50.1 22.3,44 22.3,34.9 20.4,33 20.4,31.6 17.3,28.5 17.3,28.6 17.1,28.8 7.4,28.8 6.7,28.1 6.7,23.3 8,22 28.2,22 29.7,23.5 29.7,56.9 29.2,57.4 7.6,57.4 7.2,57 7.2,52.8 7.9,52.1 17.6,52.1 24.7,45 24.7,34.1 22.2,31.6 22.2,30.1 18.8,26.7 8.8,26.7 8.7,26.8 8.7,24.5 9,24.2 26.7,24.2 27.6,25.1 27.6,55.2 9.1,55.2 9,55.1 9,54.7 9.7,54 17.7,54 25.8,45.9 25.8,32.3 24.2,30.7 24.2,30 20.5,26.3 25.5,26.3 25.5,29.3 26.1,29.9 25.8,29.9 22.5,26.6
S$99
  Bottom 3: 25.9,47.7 25.9,49.6 21,54.5 24.3,54.5 27.1,51.7
S$100
  Bottom 2: 123.4,6.9 123.4,5.2
S$101
  Bottom 1.5: 119.2,67.6 119.2,57.8 123.2,53.8 137.5,53.8 140.9,50.4 140.9,46 138.1,43.2 138.1,32.7
  Bottom 2: 138.1,32.6 138.1,32.7
S$102
  Bottom 0.5: 123.5,74.1 123.2,74.1
S$103
  Bottom 1.5: 138.1,47.2 135.2,44.3 135.2,25.9 132,22.7 R48.2
  Bottom 2: R48.2 132,9.9
S$104
  Top 0.5: 174,7.75 173.45,7.75 172.45,6.75 171.65,6.75 170.35,5.45 | Q8-10.3 170.35,5.45 | 170.35,5.45 Q8-10.2 170.9,5.9
S$105
  Bottom 0.5: 114,47.2 113.6,46.8
S$106
  Bottom 0.5: 116.4,32.7 116.1,33
S$107
  Bottom 1.5: 123.4,74 123.4,73.2 123.4,71.9 119.1,67.6
  Bottom 2: 123.4,73.2 123.4,74.9
S$108
  Bottom 0.5: 128.5,6 129.8,6 132,8.2 132,9.7
  Bottom 1.5: 132,9.7 132,8.1 130,6.1 129,6.1
S$109
  Top 1: 135.7,77.2 135.7,74.1 135.8,74 135.7,73.9 133.8,73.9
S$110
  Top 1: 138.1,6 138.1,8.8 137.1,9.8 | 137.1,9.8 142.7,9.8 | 109.1,12.3 110.1,12.3 119.4,12.3 122.4,9.3 125.2,9.3 129,9.3 131.3,7 132.8,7 135.6,9.8 137.1,9.8
  Top 1.5: 126,6 126,8.5 125.2,9.3 122.5,9.3 119.5,12.3 110.1,12.3
S$111
  Top 1.5: 128.55,38.8 128.5,38.8
S$112
  Top 1: 140.5,6 142.4,6 142.6,6 145.6,6 146.1,6.5
S$113  (via drill 0.6)
  Top 1: v122.5,12.3 123.9,12.3
  Bottom 1: v122.5,12.3 123.5,11.3 123.5,6.2
S$114
  Top 0.5: 170.9,3.05 170.9,3.55 171.85,4.5 171.85,5.45
S$115
  Bottom 1: 128.6,73.9 128.5,74
S$116
  Top 0.5: 171.8,8.35 171.9,8.35 173.3,9.75 175.3,9.75 175.8,9.25 175.8,4.7 175.35,4.25 172.9,4.25 171.85,3.2 171.85,3.05
S$117
  Top 1.5: 126,38.8 125.95,38.8
S$118
  Bottom 0.5: 135.9,73 135.7,72.8
S$119
  Top 1: 130.2,73.9 128.7,73.9 128.6,74
S$120
  Bottom 1: 135.8,8 135.8,9.7 135.7,9.8 137.6,9.8 | 135.8,8 135.8,6 | 137.6,9.8 135.8,8 | 138.7,9.8 137.6,9.8
  Bottom 1.2: 138.25,19.85 138.15,19.95 | 138.25,19.85 138.05,19.85 | 138.25,19.85 140.2,19.85 142.95,17.1 142.95,12.6 140.15,9.8 139.3,9.8 138.7,9.8 | 138.7,9.8 137.55,9.8 | 135.8,5.85 135.8,11.05 | 135.8,11.05 135.65,11.2 134.6,12.25 | 138.7,9.8 137.05,9.8 135.8,11.05
S$121
  Top 0.5: 138.1,73.8 138.1,74
  Top 1: 138.1,71 138.1,73.8 | 137.2,70.1 134,70.1 | 138.1,71 138.1,74.1 | 137.2,70.1 138.1,71 | 133.8,70.1 137.2,70.1
S$122
  Bottom 1: 136.1,8.8 136.1,9.3 136.5,9.7
S$123
  Bottom 2: 119.2,67.6 119.2,67.8
S$124  (1 unrouted)
  Top 1: 125.2,70.4 126.6,70.4 | 126.6,70.4 126.85,70.15 | 133.6,68.8 132.4,67.6 129.4,67.6 126.85,70.15 | 133.6,68.8 133.6,70.8 | 126.6,70.4 126,71 | 133.6,68.8 134.5,69.7 | 126.85,70.15 124.93,70.15
  Top 1.5: 106.1,67.7 112.75,67.7 | 126,71.2 126,71 | 126,71.2 126,74 | 126,71.2 125.2,70.4 118,70.4 115.3,67.7 113.95,67.7 112.75,67.7 | 112.75,67.7 111.05,69.4 | 113.3,67.7 112.65,67.7 111.25,66.3
S$125
  Top 3: 66,7.5 66,5.1
S$126
  Bottom 2: 128.6,6.9 128.6,5.2
S$127
  Bottom 1: 122.8,27.7 122.8,29.2 | 122.8,27.7 122.3,27.2 | 122.8,26.8 122.8,27.7
  Bottom 1.5: 132,32.7 132,28.3 130.5,26.8 122.8,26.8 119.6,26.8 117.9,28.5 117.9,30.8 | 117.95,32.65 117.9,32.6 117.9,30.8 | 116.8,31.9 117.9,30.8
  Bottom 2: 132,32.7 132,32.6
S$128
  Bottom 2: 138,47.2 138,47.3
S$129
  Bottom 2: R47.1 119.2,49.8
S$130
  Bottom 1.5: 119.3,49.9 119.3,49 117.9,47.6
S$131
  Bottom 0.8: 121.7,48.1 121.7,47 121.1,46.4
S$132
  Bottom 0.8: 123.6,48 123.6,47 124.25,46.35
S$133
  Bottom 0.5: 123.6,48.5 123.6,48.95 123.15,49.4 121.75,49.4 121.15,50 121.15,50.95 120.35,51.75
S$134
  Bottom 0.8: 122.8,50.65 126,50.65
S$135  (via drill 0.6)
  Top 1: v116.8,25.7 v120.6,29.5
S$136
  Bottom 0.8: 123.2,31.55 123.2,30.5 122.75,30.05
S$137
  Bottom 0.8: 125.1,31.85 125.1,30.55 125.85,29.8
S$138
  Bottom 0.5: 125.15,31.85 125.15,32.3 124.5,32.95 122.4,32.95 120.65,31.2 120.65,29.6 120.6,29.55
S$139
  Bottom 0.8: 124.25,34.3 125.15,34.3 128.9,30.55
S$140
  Bottom 3.81: 92.05,43.9 92.05,36.9 91.75,36.6 88.25,36.6 88.05,36.4 88.05,43.4 87.45,44 88.7,44 88.8,43.9 88.8,39 90.4,37.4 90.2,37.4 90.15,37.35
S$141
  Bottom 3: 46.4,40.9 45.6,40.1 45.6,39.9
S$142
  Bottom 3: 67.9,38.8 67.6,38.5
S$143
  Bottom 3: 69.6,40.9 69.4,40.7 69.4,36.1 69.3,36.2
S$144
  Bottom 0.5: 66.1,35.25 66.1,44.3
S$145
  Bottom 0.5: 60.8,35.15 60.8,44.7
S$146  (via drill 0.6)
  Top 1: v148.15,28.55 149.5,28.55 149.5,28.45
  Bottom 1: 148.7,36.65 147.1,36.65 145.35,34.9 145.35,29.5 146.3,28.55 v148.15,28.55
S$147
  Top 1: 63.55,37.45 66.05,37.45 68.7,34.8 77.95,34.8 82.05,38.9 113.9,38.9 116.7,36.1 119.45,36.1
S$148
  Top 1: 63.5,42.5 72.4,42.5 74.25,44.35 78.7,44.35 82.05,41 114.65,41 115.4,41 125.2,41 127.35,38.85 | 127.35,38.85 R42.2 | 127.35,38.85 128.55,38.85
S$149
  Top 1: 63.5,39.95 61.4,39.95 60.3,41.05 60.3,43.9 61.3,44.9 71.75,44.9 73.3,46.45 79.4,46.45 82.8,43.05 116.6,43.05 117.7,44.15 119.7,44.15
S$150  (via drill 0.6)
  Top 1: 129.7,47 v128.6,47 127.3,47 | v132.6,43.2 143.75,43.2 146.05,45.5 149,45.5 149.05,45.55
  Bottom 1: 129.9,44.7 129.9,44.55 | 129.9,44.7 129.9,45.7 v128.6,47 | 129.9,44.7 131.1,44.7 v132.6,43.2
S$151
  Top 1: 127.25,43.15 127.25,44.05 127.95,44.75 131.9,44.75 132.65,45.5 132.65,46.9
S$152  (via drill 0.6)
  Top 1: 133.4,50.3 v133.75,50.3
  Top 1.2: v133.75,50.3 v143.1,50.3 | 133.4,50.3 132.8,49.7 132.8,47.35
  Bottom 1: v143.1,50.3 143.1,57.2 | v133.75,50.3 132.45,50.3
  Bottom 1.2: v143.1,50.3 v143.1,75.85
S$153  (via drill 0.6)
  Top 1: 119.9,36.2 v122.3,36.2 v140.85,36.2 144.05,36.2 145.85,34.4 151.15,34.4 155.9,29.65 159.65,29.65 160.8,28.5 160.8,25.65 159.35,24.2 | v145.75,11.7 145.75,10.3
  Bottom 1: 122.15,43.1 121.75,42.7 121.75,37.4 122.3,36.85 | 122.3,36.85 122.6,36.55 128.95,36.55 129.65,35.85 | 122.3,36.85 v122.3,36.2 122.5,36.4 | v145.75,11.7 145.75,20.9 140.85,25.8 v140.85,36.2
S$154
  Bottom 1: 129.45,35.85 129.7,35.85 129.75,35.9 129.75,37 | 129.95,41.8 129.95,41.05 130.75,40.25 130.75,38 130.05,37.3 129.75,37 | 129.15,36.4 129.75,37
S$155
  Bottom 1.5: 66.95,44.6 66.95,34.8 66.9,34.75
S$156
  Bottom 3: 68,34.05 68,44.75 68.15,44.9 69.2,44.9 69.35,45.05 69.35,34.8 70.05,34.1 70.05,45.7 70.15,45.8
S$157
  Bottom 3: 45.1,44.1 45.4,44.4 56.6,44.4 56.85,44.65 56.85,37.35 56.75,37.25
S$158
  Top 0.5: 170.4,9.4 169.85,9.4
S$159
  Top 0.5: 169.9,8.7 169.9,8.75 170.85,9.7 169.15,9.7 | 169.95,8.5 169.95,8.9 169.15,9.7 | 169.15,9.7 168.25,10.6
S$160
  Top 0.5: Q8-10.1 173.9,5.45 R13.1
S$161
  Top 0.5: 168.3,6.15 168.3,7.8 164.65,7.8 164.3,7.45 163.2,7.45 163.2,5.35 163.6,4.95 168.2,4.95 168.3,5.05 168.3,6.1 168,6.4 168,7.4 167.95,7.45 164.5,7.45 164.25,7.2 164.25,6.05 167.35,6.05 167.65,6.35 167.65,7.05 167.6,7.1 164.65,7.1 164.55,7 164.55,6.4 167.35,6.4 167.4,6.35 167.4,6.6 167.35,6.65 164.85,6.65 164.75,6.55
S$162  (via drill 0.8 pad 1.5)
  Top 1: v163.85,66.6 163.85,67.85 | 163.85,11.4 v163.85,14.3
  Bottom 1.5: v163.85,14.3 163.85,19.55 164.95,20.65 164.95,58.85 163.85,59.95 v163.85,66.6
S$163
  Top 0.5: 164.35,73.85 164.35,71.55 167.95,71.55 168.25,71.85 168.25,73.75 164.7,73.75 164.65,73.7 164.65,71.75 164.7,71.7 167.65,71.7 167.9,71.95 167.9,73.25 167.8,73.35 165.05,73.35 164.95,73.25 164.95,71.95 164.9,71.9 167.55,71.9 167.65,72 167.65,72.5 | 167.65,72.5 167.65,73.1 165.2,73.1 165,72.9 165,72.3 167.4,72.3 167.45,72.25 167.45,72.7 167.35,72.8 165.4,72.8 165.25,72.65 165.4,72.65 165.45,72.6 167.55,72.6 167.65,72.5
S$164
  Bottom 1.5: 37.9,76.85 30.85,76.85 28.65,74.65
S$165
  Bottom 1.5: 27.4,70.6 27.4,71.2 28.85,72.65
S$166
  Bottom 1.5: 23.4,72.5 24.65,71.25 24.65,70.75 24.65,70.5 24.65,67.45 26,66.1
S$167  (via drill 1.5 pad 3)
  other vias: 25.95,78.2
S$168
  Bottom 1.5: 26,78.2 29.55,78.2 30.95,76.8
S$169  (via drill 0.4, 0.6)
  Top 0.6: v174.15,71.65 v176.65,71.65
  Top 1: v176.45,62.8 160.95,62.8 159.3,61.15 159.3,60.75 159.3,60.45 159.3,59.25
  Bottom 0.5: v174.15,71.65 173.5,71.65 173.4,71.75 | v176.65,71.65 176.65,63.3 | 176.65,63.3 176.65,62.8 | 176.65,62.8 176.65,62.25 | 176.65,62.25 176.65,61.45 176.05,60.85 173.4,60.85 | 176.15,62.8 v176.45,62.8 176.65,62.8 | 173.9,62.8 176.15,62.8 | 176.15,62.8 176.65,63.3 | 175.55,62.8 176.1,62.8 176.65,62.25
S$170
  Top 1.5: 12,5.6 34,5.6
S$171
  Bottom 1.5: 36.7,3.2 31.95,3.2 30.85,3.2 | 30.85,3.2 28.6,5.45 | 30.85,3.2 27.2,3.2 25.9,1.9
S$172
  Bottom 1.5: 27.4,8.95 27.4,8.35 29,6.75
S$173
  Bottom 1.5: 23.3,7.1 24.6,8.4 24.6,8.95 24.6,9.05 24.6,12.55 26,13.95
S$174
  Bottom 1.5: 157.3,8.65 155.1,8.65 154.1,9.75
S$175
  Top 1.5: 154.1,9.8 150.85,9.8 143.05,17.6 143.05,20.75 139.2,24.6 120.3,24.6 116,20.3 45.4,20.3 41.7,24 26.25,24 26,24
  Top 2: 26.25,24 41.95,24 45.5,20.45 116.3,20.45 120.8,24.95 139.05,24.95 142.95,21.05 142.95,18 150.95,10 153.7,10 153.95,9.75
S$176
  Top 1: 150.9,59.2 152.6,59.2 | 150.9,59.2 149.5,59.2 149.5,59.1 | 150.1,63.2 150.1,61.3 150.1,60.1 | 150.1,60.1 150.1,60 150.9,59.2 | 149.6,59.6 150.1,60.1
S$177
  Bottom 0.5: 171.5,71.75 168.9,71.75 167.85,72.8 167.85,73.95
S$178
  Top 0.5: 157.15,59.15 157.15,58.65 156.55,58.05 154.4,58.05 154.15,57.8 150.95,57.8 150.1,56.95
S$179
  Bottom 0.5: C17.2
S$180
  Bottom 1: 152.45,16.5 152.45,14.15 149.9,11.6 149.9,8.9 150.25,8.55 154.1,4.7 157.75,1.05 165.15,1.05 166.9,2.8 176.9,2.8
  Bottom 1.5: 157.25,5.9 155.3,5.9 154.1,4.7 150.9,1.5 42.4,1.5 40.65,3.25
S$181
  Bottom 1: 149.9,16.5 149.9,18.45 152.25,20.8
S$182
  Top 0.8: 152.75,59.3 155.25,59.3
S$183
  Top 1: 148.6,54 148.6,54.9 149.65,55.95
S$184
  Top 1: 153,54.65 153,54.5 | 153,54.65 153,55.8 | 150.85,54.1 152.45,54.1 153,54.65
S$185
  Top 1: 154.9,54.1 154.9,54.85 156.25,56.2 | 156.25,56.2 156.25,56.7 | 156.25,56.2 156.3,56.25
S$186
  Top 1: 148.75,47.7 148.75,49.55 149.55,50.35 149.55,51.55
S$187
  Bottom 1: 147.7,58.15 148.3,58.75 | 147.7,58.15 147.7,59.05 | 147.7,58.15 145.3,55.75 145.3,44.6 146.7,43.2 148.75,43.2
S$188
  Top 1: 154,51.5 156.6,51.5 157.4,52.3 157.35,52.3
S$189
  Top 1: 148.75,45.4 150.9,45.4 155.5,50 159.55,50 160.3,50.75 160.3,54.3 159.5,55.1 159.5,55.65
S$190
  Top 0.8: 157.2,20.6 157.2,14.9 155.8,13.5 153.65,13.5 152.55,14.6 152.55,14.65 152.45,14.75 152.45,15.65 152.45,15.9 152.45,16.5
S$191  (via drill 0.6)
  Top 1: 162.05,59.1 v162.05,57.65 162.05,56.6
  Bottom 1: 159.15,52.75 159.15,55.95 160.85,57.65 v162.05,57.65
S$192  (via drill 0.6)
  Top 1: v161.9,52.75 163.3,52.75
S$193
  Top 0.8: 159.2,58.9 159.1,58.9 157.55,57.35 157.3,57.1 | 157.3,57.1 156.45,56.25 156.4,56.25 | 157.3,57.1 156.4,57.1
S$194
  Top 1: 149.5,20.55 152.5,20.55
S$195
  Top 0.5: 150.15,22.9 151.05,22 154.15,22 155.25,20.9 155.25,20.6
S$196
  Top 0.8: 150.5,25.6 150.5,24.4 149.9,23.8
S$197
  Top 0.8: 154.9,25.35 154.9,24.9 153.55,23.55 152.85,23.55
S$198
  Top 0.5: 148.6,25.95 148.6,26.35 149.25,27 151.2,27 151.75,26.45 151.75,24.25 152.4,23.6
S$199
  Top 0.5: 153,25.8 153,26.1 153.9,27 155.7,27 156.2,26.5 156.2,23.8 | 156.2,23.75 156.2,23.2 | 156.2,23.8 156.2,23.75 | 156.2,23.75 155.95,23.5 155.95,22.55 | 156.2,23.8 156.5,23.5 156.5,22.55
S$200
  Top 0.5: 164.15,71.6 163.25,71.6 163.25,74.55 163.55,74.85 168.2,74.85 168.35,74.7 168.35,70.55 163.3,70.55 163.25,70.6
S$201
  Top 0.5: 167.8,2.6 164.21,2.6 C6.-
S$202
  Top 2: 126,5.2 126,6.9
S$203  (via drill 0.6)
  Top 1: v150.5,39 161.7,39 | v143.25,32.55 140.7,30 122.75,30 121.7,31.05 119.55,31.05 118.5,30 51.65,30 46.9,34.75 43.05,34.75 38.65,39.15 38.65,40
  Bottom 1: v150.5,39 146.4,39 143.25,35.85 v143.25,32.55
S$204
  Top 1: 149.55,28.25 149.35,28.25 149.15,28.45
S$205  (via drill 0.6)
  Top 1: 148.7,32.05 146.85,32.05 145.35,30.55 v145.35,24.25
  Bottom 1: v145.35,24.25 147.65,21.95
S$206
  Bottom 1: 153.2,20.45 155,18.65 155,16.8 155,16.5 155,13.4 154.95,13.35
S$207
  Bottom 1: 152.65,19.95 153.15,19.95 153.65,19.95 | 152.65,19.95 151.65,19.95 | 152.7,20.1 152.7,20 152.65,19.95
S$208
  Top 1: 152.5,16.5 152.5,20.6
S$209
  Top 3: 115.6,72.5 115.6,74.9
S$210
  Bottom 1: 150.9,59.65 148.65,59.65 148.2,59.2 151.05,59.2 151.45,58.8 148.8,58.8
S$211
  Bottom 1: 122.8,28.2 122.8,27.6 123.3,27.1
S$212  (via drill 1.5 pad 3)
  other vias: 25.95,1.9
S$213
  Top 2: 128.6,73.2 128.6,74.9
S$214
  Top 2: 128.6,5.2 128.6,6.9
S$215
  Bottom 1: 147.6,22 148.1,21.5 151.65,21.5
S$216
  Bottom 1: 147.7,59.9 147.7,59.1 148.75,58.05 | 147.35,57.8 147.6,58.05 148.75,58.05 | 148.75,58.05 152.5,58.05
S$217
  Top 3: 58,72.4 58,74.8
S$218
  Top 2: 126,73.2 126,74.9
S$219
  Top 2: 123.4,5.2 123.4,6.9
S$220
  Top 3: 77.2,72.4 77.2,74.8
S$221
  Top 3: 96.4,72.4 96.4,74.8
S$222
  Top 3: 104.4,7.5 104.4,5.1
S$223
  Top 3: 85.2,7.5 85.2,5.1
S$224
  Top 3: 46.8,7.5 46.8,5.1
S$225
  Top 0.8: 154,28.3 156.65,28.3 | 156.65,28.3 157.5,28.3 157.95,27.85 | 157.95,27.85 157.95,27.9 | 157.95,27.85 157.95,27.45 157.85,27.35 157.6,27.35 156.65,28.3
S$226  (via drill 0.6)
  Top 1: v162.25,27.1 163.45,27.1
S$227  (via drill 0.6)
  Top 1: 162.15,23.55 v162.15,22.1 162.15,20.75
  Bottom 1: 159.45,27.1 159.45,24.8 v162.15,22.1
S$228
  Top 0.7: 157.1,22.95 156.2,22.95 | 157.1,22.95 157.15,22.9 157.6,22.45 | 156.4,22.45 157.6,22.45 | 157.6,22.45 159.15,20.9 | 157.1,22.95 156.65,23.4
S$229
  Top 0.5: 171.55,52.15 171.55,52.55 169.75,54.35
S$230
  Bottom 1: 170,43.35 170,40.6 170.6,40
S$231
  Bottom 0.5: 27.9,5.45 27.6,5.45 27.6,4.3 26.6,3.3 26.9,3.3 27.75,4.15 28.9,4.15 29,4.05
S$232
  Bottom 0.5: R11.1 167.9,5.75 | R11.1 167.8,5.69 | Q3-4.1 171.19,10.44 167.7,6.95 167.7,5.79 R11.1
S$233
  Bottom 0.5: Q3-4.4 173.39,6.18 R10.1
S$234
  Bottom 0.5: R18.1 171.02,5.67 172.45,7.1 Q3-4.5 Q3-4.2 Q13.2
S$235
  Bottom 0.5: Q3-4.3 173.39,10.94 173.95,11.5 173.95,17.19 | 173.95,17.19 R19.1 | Q46-47.3 174.09,21.56 174.8,20.85 174.8,18.04 173.95,17.19
S$236
  Bottom 0.5: Q3-4.6 170.74,8.04 169.4,6.7 169.4,4.6 169.05,4.25 166.6,4.25 166.15,4.7 166.15,7.1 171.2,12.15 171.2,13.65 | 171.2,13.65 171.75,14.2 | 171.75,14.2 172.2,14.2 Q13.1 | 171.2,13.65 171.2,14.6 | 171.2,14.6 171.2,16.9 | 171.75,14.2 171.6,14.2 171.2,14.6
S$237
  Top 0.1: 171.9,76.3 171.9,76.8 | 171.9,76.8 172.45,76.8 172.45,76.05 | 172.45,76.05 172.45,75.95 | 172.45,75.95 172.45,75.3 | 172.45,75.3 172.3,75.3 171.85,75.3 171.85,76.8 171.9,76.8 | 172.75,75.75 172.45,76.05 | 172.65,75.8 172.6,75.8 172.45,75.95 | 172.45,75.3 172.55,75.3 172.65,75.4
S$238
  Top 0.1: 172.95,75.7 172.95,75.8 172.8,75.8 172.4,76.2
S$239
  Top 0.1: 172.5,74.5 172.4,74.4 171.75,74.4 171.75,74.85 172.55,74.85
S$240
  Top 0.1: 169.8,74.45 170,74.45 170,74.9 169.5,74.9 169.5,74.3
S$241
  Top 0.1: 169.8,75.65 169.45,75.65 169.45,75.8 170.35,75.8 170.35,75.35 169.45,75.35 169.45,75.6
S$242
  Top 0.1: 169.7,76.75 169.7,76.3 170.65,76.3 170.8,76.45 170.8,76.75
S$243
  Bottom 1.5: 156.7,71.35 155.25,71.35 154.1,70.2
S$244
  Bottom 1: 176.75,76.9 166.85,76.9 165.05,78.7 157.5,78.7 154.1,75.3 150.1,71.3 150.1,66.8 | 155.2,63.1 155.2,64.4 153.6,66 150.9,66 | 148.2,63.2 150.1,63.2 150.1,65.2 | 150.1,66.8 150.1,65.2 | 150.1,65.2 150.9,66 | 150.1,66.8 150.9,66
  Bottom 1.5: 41.9,76.85 43.35,78.3 151.1,78.3 154.1,75.3 155.25,74.15 156.9,74.15
S$245
  Bottom 0.5: 173.35,67.35 173.35,67.8 172.45,68.7 172.45,69.35 172.45,69.55 172.45,72.55 171.35,73.65
S$246
  Bottom 0.5: 171.5,67.55 171.5,69.35
S$247
  Top 0.5: 169.7,51.95 169.65,51.9
S$248
  Bottom 1: 156.9,71.35 167.05,71.35 169.5,68.9 169.5,66.55 170.9,65.15 172.35,65.15
S$249
  Bottom 0.5: 172.45,56.35 172.45,60.85
S$250
  Bottom 0.5: 173.45,69.35 174.5,69.35 175.4,70.25 175.4,72.55 174.4,73.55
S$251  (via drill 0.4)
  Top 0.8: v168.7,64.7 v171.5,67.45
  Bottom 0.5: 171.5,58.45 169.4,58.45 168.7,59.15 168.7,60.3 168.7,60.45 168.7,62.35 | 169.15,62.8 171,62.8 | 168.7,63.25 v168.7,64.7 | 168.7,63.25 169.15,62.8 | 168.7,62.35 168.7,63.25 | 168.7,62.35 169.15,62.8
S$252
  Bottom 1: 176.85,74.1 177,74.1 178.15,72.95 178.15,65.75 178.15,65.3 178.15,60.95 176.9,59.7
S$253  (via drill 0.4)
  Top 0.8: v174.35,58.45 174.35,54.7
  Bottom 0.5: v174.35,58.45 173.4,58.45
S$254
  Top 0.5: 172.5,52.2 172.5,51.65 172.05,51.2 | 172.05,51.2 171.55,51.2 | 171.55,51.2 171.1,51.2 | 171.1,51.2 170.05,51.2 169.6,51.65 | 171.55,48.65 171.55,50.45 171.55,50.7 | 171.55,50.7 171.55,51.2 | 171.55,50.7 172.05,51.2 | 171.55,50.7 171.55,50.75 171.1,51.2
S$255
  Bottom 1: 173.4,56.3 171.2,56.3
S$256
  Bottom 0.5: 173.5,53.2 172.4,53.2 171.45,53.2
  Bottom 1: 172.4,53.2 172.4,37.05
S$257
  Top 0.5: 172.5,54.6 172.5,54 173.1,53.4 174.2,53.4 175.45,52.15
S$258  (via drill 0.4)
  Top 0.8: v170.55,60.85 168.7,59 168.7,54.9
  Bottom 0.5: v170.55,60.85 171.45,60.85
S$259  (via drill 0.4)
  Top 0.5: v174.35,46.3 173.45,46.3
  Bottom 0.5: v174.35,46.3 174.35,50.2 v176,51.85
S$260
  Top 0.5: 173.45,54.55 173.7,54.55 173.85,54.55 | 173.85,54.55 175.65,54.55 | 173.85,54.55 174.3,55
S$261
  Top 0.5: 173.45,49.25 173.45,48.7 174,48.7 | 173.45,49.25 173.45,52.2 | 176.15,48.7 174.55,48.7 174,48.7 | 174,48.7 173.45,49.25
S$262
  Top 0.5: 172.5,48.65 172.5,47.95 172.95,47.5 176.4,47.5 176.55,47.5 178,47.5 179.1,48.6
S$263  (via drill 0.4)
  Top 0.5: v171,54.8 171.35,54.8 171.55,54.6
  Bottom 0.5: v171,54.8 169.45,54.8 168.7,54.05 168.7,52.35 170.7,50.35 v170.7,48.1
S$264
  Top 0.5: 171.55,46.3 171.55,47.25 170.95,47.85 170.7,48.1 170.45,48.35 169,48.35
S$265
  Top 0.5: 172.5,46.25 172.5,45.85 172,45.35 171.05,45.35 170.45,45.95 170.45,47 170,47.45 167.35,47.45 166.3,48.5
S$266  (via drill 0.4)
  Top 1: v177.6,14.05 175.6,14.05
S$267  (via drill 0.4)
  Top 0.5: 176.45,46.05 176.45,44.9 176.45,44.6 v176.45,44.4
  Top 0.8: 168.7,45.95 168.7,44.9 169.15,44.45 | 176.45,44.6 175.7,43.85 169.75,43.85 169.4,44.2 169.15,44.45 | 176.45,44.9 176.45,45.2 176.15,45.5 | 169.15,46.05 169.15,44.45
S$268
  Top 0.5: 168.7,45.9 168.75,45.9
S$269
  Top 1: 165.8,45.9 165.8,34.2
S$270  (via drill 0.6)
  Top 1: 178,37.2 178,41.5 | 178,37.2 v178.85,36.35 | 178,37.2 177.4,37.8 v169,37.8
  Bottom 1: 183.45,26.4 178.85,31 v178.85,36.35
S$271
  Top 1: 174.15,40 174.15,40.7 172.75,42.1 167.45,42.1 166.4,42.1 | 166.4,42.1 166.05,42.1 | 166.4,42.1 165.9,41.6 | 166.4,42.1 165.85,42.65
S$272
  Bottom 1: 168.75,49.35 167,51.1 167,59.85 165.9,60.95 165.9,67.9 164.6,69.2 155.15,69.2 154.15,70.2
S$273
  Bottom 1: 172.4,26.75 172.4,37
S$274
  Bottom 0.5: Q46-47.6 171.57,17.18 R19.2
S$275
  Bottom 1: 176.1,22.15 176.1,6.3 176.75,5.65
S$276
  Top 0.5: Q11-12.1 170.91,24.3 R17.1
S$277  (via drill 0.4)
  Top 0.5: 171.3,24.7 170.5,23.9 170.5,23.95 170.15,24.3
  Top 0.8: v170.5,21.55 170.5,23.1 170.5,23.9
  Bottom 0.5: v170.5,21.55 171.55,21.55
S$278  (via drill 0.4)
  Top 0.8: 176.4,24.3 176.4,21.25 v173.6,18.45
  Bottom 0.5: v173.6,18.45 173.6,18.8 173.45,18.95 173.45,19.15
S$279
  Bottom 1: 176.85,59.65 176.85,57.7 175.4,56.25 173.8,56.25 173.75,56.2
S$280
  Bottom 1: 173.6,53.1 171.65,53.1 171.45,53.3 174,53.3
S$281  (via drill 0.4)
  Top 0.5: Q11-12.2 172.53,25.52 171.9,26.15 169.76,26.15 R17.2 168.85,27.22 v168.85,28.55 | Q1-2.6 171.58,32.57 v171.15,33
  Bottom 0.5: v171.15,33 171.15,30.85 v168.85,28.55
S$282
  Top 0.5: Q11-12.4 175.95,24.9 175.95,24.78 R16.2
S$283
  Top 0.5: Q11-12.5 172.53,27.78 173,28.25 | 173,28.25 173.7,28.25 | 173.7,28.25 173.85,28.25 | R16.1 175.32,28.25 174.32,28.25 173.85,28.25 | 173.48,28.73 173.48,28.47 173.7,28.25 | 173.48,28.73 Q1-2.3 | 173.48,28.73 173,28.25 | 173.85,28.25 173.44,28.66
S$284
  Bottom 0.5: D10.C 173.63,26.7
S$285
  Bottom 1: 173.85,26.65 173.9,26.7
S$286
  Bottom 0.5: 172.5,20.35 172.52,20.33 Q46-47.5 Q46-47.2 172.52,23.47
S$287
  Bottom 1: 176.1,22.25 176.1,22.7 175.5,23.3 171,23.3
S$288
  Bottom 1: 171.2,26.7 173.95,26.7
S$289  (via drill 0.4)
  Top 0.5: v174.3,25 173.5,25 | v174.25,31.05 173.5,31.8 173.5,32.15
  Bottom 0.5: v174.3,25 175.3,25 175.85,25.55 175.85,27.75 174.25,29.35 v174.25,31.05
S$290
  Top 0.5: Q11-12.6 171.58,28.94 171.58,29.42 | 171.58,29.42 Q1-2.1 171.21,29.79 | 171.21,29.79 170.27,29.79 R5.1 | 171.58,29.42 171.21,29.79
S$291
  Top 0.5: Q1-2.4 173.48,31.82 174.25,31.05 176.42,31.05 R4.1
S$292
  Top 0.5: Q1-2.2 172.53,30.37 171.9,31 171.1,31 170.6,31.5 170.6,31.95 170.2,32.35 167.35,32.35 166.15,31.15
S$293
  Top 0.5: R9.2 165.77,38.09
S$294
  Top 0.5: 179.15,31.15 177.95,32.35 175.25,32.35 174.6,33 172.9,33 172.53,32.63 Q1-2.5
S$295
  Top 1: 183.45,26.4 183.45,30.85
S$296
  Top 1: 183.45,41.45 182.05,41.45 181.8,41.45 | 181.8,41.45 180.9,41.45 | 181.8,41.45 181.2,42.05 | 181.8,41.45 181.15,40.8
S$297  (via drill 0.4)
  Top 0.5: v176.45,44.4 v176.46,44.41 | v177.6,14.05 175.6,14.05 R84.2
  Top 0.8: v176.46,44.41 R28.2
  Bottom 0.5: v177.6,14.05 177.65,14.1 177.85,14.3 177.85,27.75 177.25,28.35 177.2,28.35 176.45,29.1 176.45,31.25 174.45,33.25 174.45,37.4 176.45,39.4 v176.45,44.4
  Bottom 1: v176.45,44.4 176.45,39.35 174.5,37.4 174.5,33.2 176.45,31.25 176.45,29.2 177.9,27.75 177.9,14.35 177.65,14.1
S$298  (via drill 0.4)
  other vias: 171.15,33
S$299  (via drill 0.4)
  other vias: 168.85,28.55
S$300
  Bottom 0.5: 60.7,35.25 66.45,35.25
S$301  (via drill 0.4)
  other vias: 179.9,69.65
S$302
  Bottom 3: 111,46 111.2,46.2 117,46.2 117.7,45.5 117.7,34 117.6,34.1 82.9,34.1 81.8,33 71.6,33 70.6,34
S$303  (via drill 0.4)
  Top 1: 159.4,20.55 159.4,18.3 159.7,18 159.95,17.75 161.05,16.65 v173.9,16.65
S$304
  Top 1: 179.55,33.7 181.05,35.2 181.05,44.4 179.7,45.75
S$305
  Top 1: 186,37.8 186,41.35
S$306
  Top 1: 183.45,37.8 183.45,33.6 184.8,33.6 186.45,31.95 186.45,24.5 185.25,23.3 183.55,23.3 183.45,23.4
S$307  (via drill 0.4)
  Top 0.5: 176.8,69.65 R83.1 | 176.55,34.35 176.55,34.55 | 176.36,33.95 R4.2 176.55,34.35 | 176.55,34.35 176.55,34.05
  Top 0.8: 168.75,33.65 168.75,34.55 169.15,34.95 | 175.65,35.35 174.9,35.35 169.55,35.35 169.15,34.95 | 175.65,35.35 175.75,35.35 176.55,34.55 v176.55,35.3 176.5,35.35 175.65,35.35 | 176,34.05 176,35 175.65,35.35 | 169.15,33.9 169.15,34.95
  Top 1: v179.9,69.65 176.8,69.65
  Bottom 0.5: v179.9,69.65 179.95,69.6 180.05,69.5 180.05,60.5 178.6,59.05 178.6,39.45 176.55,37.4 v176.55,35.3
  Bottom 1: 176.55,35.25 176.55,37.05 178.7,39.2 178.7,58.8 180.1,60.2 180.1,69.45 179.95,69.6
S$308
  Bottom 3: 59.25,34.9 59.25,46.2
S$309
  Bottom 3: 46.35,39.95 46.75,39.55 55.15,39.55 55.3,39.7 55.3,42.95 54.7,42.35 45.3,42.35 45.05,42.1
S$310
  Bottom 1.5: 70,33 68.15,33 68.1,33.05 67.8,33.35 | 67.8,33.35 66.8,34.35 59.1,34.35 59.05,34.3 59.05,33.4 59.1,33.35 67.8,33.35
S$311
  Bottom 3: 60.4,32.95 59.75,32.95 59.15,33.55 47.7,33.55 45.5,35.75 38.95,35.75 38.5,36.2 38.5,45.55 38.9,45.95 57.6,45.95 58.2,45.35 58.2,36.8 57.7,36.3 48.45,36.3 46.7,38.05 40.9,38.05 40.6,38.35 40.6,39.95 40.75,40.1 46.8,40.1 48.55,38.35 57.05,38.35 57.15,38.45
S$312
  Bottom 0.5: 27.65,74.65 27.65,76.25 26.4,77.5
S$313
  Bottom 1.5: 28.55,75.3 28.55,75.4 28.35,75.6 28.35,76.5 27.2,77.65 28.35,77.65 29.55,76.45
S$314
  Bottom 0.5: 157.55,74.2 157.55,75.7 160.15,78.3 160.15,78.95
S$315
  Bottom 0.5: 149.5,78.8 157.25,78.8 157.4,78.95
S$316
  Bottom 0.5: 150.15,71.1 149.9,71.1 149.85,71.05 149.85,75.6 147.6,77.85
S$317
  Bottom 0.5: 156.6,73.65 152.75,73.65 151.9,72.8
S$318
  Bottom 1.5: 150.55,72.45 150.55,76.1 148.9,77.75 150.8,77.75 151.25,78.2 158.95,78.2 | 159.1,78.2 158.95,78.2 | 158.95,78.2 156.85,76.1 156.85,74.55 156.8,74.5 152.2,74.5 151.3,73.6 151.3,76.75 151.05,77 156.35,77 156.8,77.45 156.75,77.45 155.75,76.45 155.75,75.5 155.85,75.4 152.5,75.4 151.7,76.2
S$319
  Bottom 0.5: 121.6,48.6 120.4,48.6 119.85,49.15
S$320
  Bottom 0.5: 121.8,46.6 121.8,46.9
S$321
  Bottom 0.5: 123.6,46.5 123.55,46.5 123.55,46.9
S$322
  Bottom 1.5: 121.1,48 119.9,48 | 119.85,48 119.9,48 | 119.9,48 120.9,47
S$323
  Bottom 0.5: 169.7,45.65 168.45,45.65 167.55,44.75
S$324
  Bottom 0.5: 167.7,45.35 167.7,45.75 168.65,46.7 168.65,46.55 168.85,46.35 168.85,46 168.4,46 167.95,45.55 167.95,45.6 168.7,46.35
S$325
  Bottom 0.5: 173.55,27.15 172.45,27.15
S$326
  Bottom 0.5: 172.65,22.85 174,22.85 175.4,22.85 175.95,22.3
S$327
  Bottom 0.5: 155.5,6.4 152.75,6.4 150.65,8.5
S$328
  Bottom 0.5: 157.95,5.9 157.95,3.8 160.65,1.1
S$329
  Bottom 0.5: 150.4,1 157.45,1 157.65,0.8 157.8,0.8
S$330
  Bottom 0.5: 149.65,10 149.65,5 146.45,1.8
S$331
  Bottom 1.5: 150.2,7.75 150.2,4.6 147.55,1.95 151.25,1.95 151.4,1.8 158.95,1.8 159.3,1.45 159.15,1.45 157.15,3.45 157.15,5.75 151.7,5.75 150.75,6.7 150.75,4.25 149.6,3.1 156.1,3.1 156.15,3.15 156.15,4.55 156.25,4.65 151.85,4.65 151.8,4.6 151.8,4.2 151.6,4 155.45,4 155.5,3.95
S$332
  Top 0.5: 138.15,8.4 138.35,8.4 138.35,8.7 139.25,9.6
S$333
  Top 0.5: 138.85,9.65 138.35,9.15
S$334
  Top 0.5: 126.05,8.7 126.05,8.65 126.5,8.2 126.5,8.35 127.3,9.15
S$335
  Top 0.5: 135.6,70.25 135.4,70.25 134.3,69.15
S$336
  Top 0.5: 136.35,70.15 136.35,70.25 136.25,70.35 135.15,70.35 134.25,71.25
S$337
  Top 0.5: 130.45,73.7 130.45,73.45 130.2,73.2 129.3,73.2
S$338
  Top 0.5: 184.25,33.1 185.15,33.1
S$339
  Top 0.5: 185.3,33.3 185.3,33.45 184.6,34.15 183.75,34.15
S$340
  Top 0.5: 178.2,38.45 178.4,38.45 178.4,37
S$341
  Top 0.5: 175.75,55 174.75,55
S$342
  Top 0.5: 175.75,55.15 174.65,55.15
S$343
  Bottom 1: 169.8,46.25 168.75,47.3 168.75,47.65 | 168.75,47.65 168.75,49.4 | 168.75,47.65 167.35,46.25 167.35,39.45 169,37.8
S$344
  Top 0.5: 169.28,23.75 169.77,23.75 170.37,23.15
S$345
  Top 0.5: 170.34,23.91 169.37,23.91 169.35,23.93
S$346
  Bottom 0.8: 169.7,13.2 169.7,12.65 | 169.7,12.65 169.35,12.3 165.3,8.25 158.3,8.25 157.45,9.1 | 169.7,12.65 170.05,13
S$347
  Bottom 0.8: 149.8,18.35 149.8,19.65 147.8,21.65
S$348
  Bottom 0.8: 150.2,19.45 150.2,20.1 149.25,21.05 150.75,21.05 150.9,20.9 150.9,20.15 150.65,19.9 150.65,20.35 150.3,20.7

## Text on the board
Top: Copyright | marian@elforum
tNames: 190*80mm | +VccAux | B1 | E1 | B2 | C1 | C2 | E2 | +Vcc | C1 | B2 | E2 | Gnd | E1 | B1 | C2 | Amplificator | Mosfet400 | C1 | B2 | E2 | E1 | B1 | C2 | Out+ | C1 | B2 | E2 | E1 | B1 | C2 | C1 | B2 | E2 | In+ | E1 | B1 | C2 | Out- | In- | -Vcc | C2 | B1 | E1 | E2 | B2 | C1 | -VccAux
bNames: E1 | B1 | C2 | C1 | B2 | E2 | Putere 400W/4Ohm | Maxim +/-70Vcc | E1 | B1 | C2 | C1 | B2 | E2 | Schema&Pcb | Feb. 2017 | Marian@Elforum | E1 | B1 | C2 | E2 | C1 | B2 | E1 | B1 | C2 | C1 | B2 | E2